# Altium PCB TuringSMD - Copy.PcbDoc (part 2 of 2)
Units mm, origin at the board's own origin, x right, y up, seen from the top; angles counter-clockwise.
Board outline 28 x 100 mm, 2 copper layers (Top Layer, Bottom Layer); 77 components, 85 nets, 274 pads, 71 vias.
Unrouted connection lines stored in the file: 107.
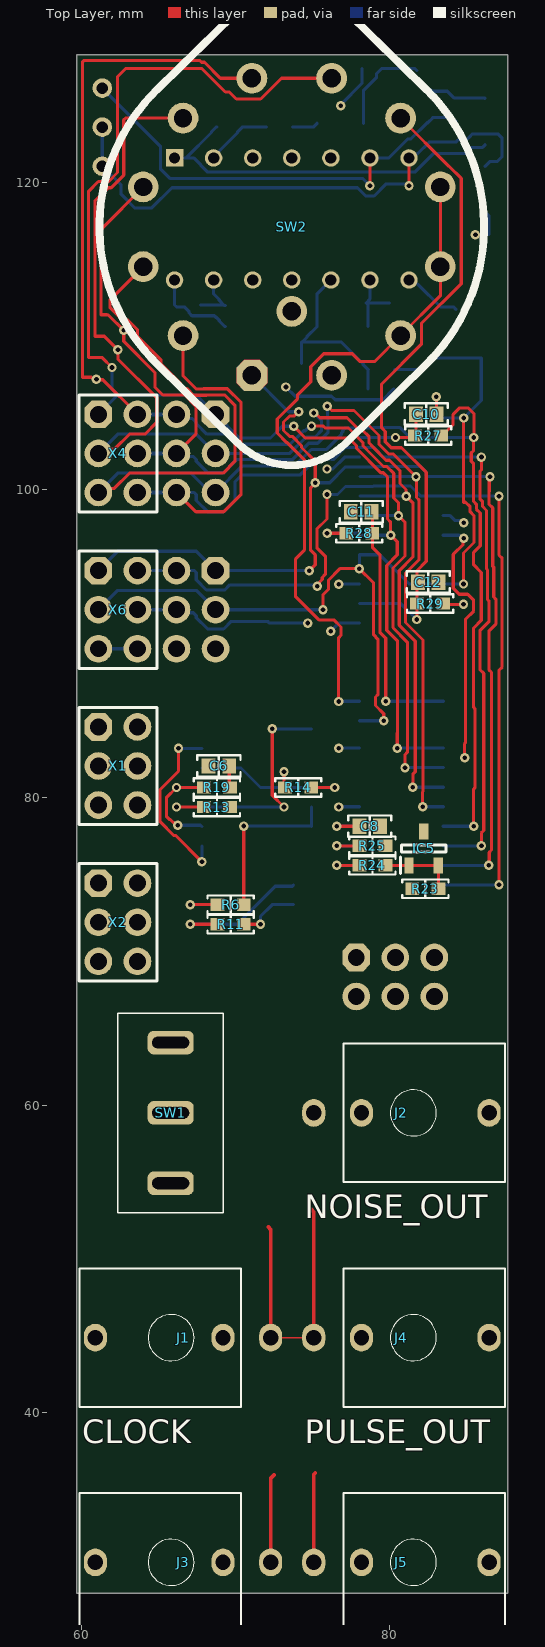
[diagram p0: Top Layer view]

## Via types
v1: diameter 0.61, hole 0.305, Top Layer to Bottom Layer, 71 vias

## Nets (pads, with @x,y where several pads share a name; then routed paths per layer and width w, separated by ;. In a path a pad name is that pad's centre, name@x,y a point inside that pad or via, vN(x,y) a via of type N, cw(c..) or ccw(c..) an arc to the next point about the centre after c; other vN are vias at no path point) (continued)
SCALE_W: J5.3 X1.3 X1.4
STEP12: C12.2 IC7.7 R29.1 SW2.8 | length 42.4
  Top Layer w0.203: SW2.8 83.858,121.038 83.881,121.038 84.675,120.244 84.675,113.392 82.087,110.804 82.087,109.461 79.502,106.877 79.502,104.026 79.74,103.788 79.74,103.121 80.127,102.734 80.794,102.734 82.4,101.128 82.4,95.347 81.806,94.754 R29.1 81.806,91.585 v1(81.788,91.567)
  Bottom Layer w0.203: IC7.7 80.756,92.599 v1(81.788,91.567)
STEP16: IC7.2 SW2.9 SW2.10 SW2.11 | length 44.7
  Top Layer w0.203: v1(76.708,86.233) 76.708,90.379 76.86,90.531 76.86,91.079 76.397,91.542 75.418,91.542 73.914,93.046 73.914,95.504 74.482,96.072 74.482,101.951 73.373,103.06 73.341,103.06 72.716,103.685 72.716,104.6 74.041,105.925 74.041,106.172 74.893,107.024 74.893,107.996 75.735,108.839 77.597,108.839 78.105,108.331 79.039,108.331 SW2.11 83.319,112.611 SW2.10 SW2.9
  Bottom Layer w0.203: v1(76.708,86.233) 76.724,86.249 IC7.2
WRITE_SW: C6.2 IC6.15 R3.1 R19.1 | length 18.5
  Top Layer w0.203: C6.2 69.596,80.694 R19.1 ; v1(84.845,96.844) 84.797,96.796 84.797,96.437 84.159,95.799 84.159,93.596 84.546,93.209 85.093,93.209 85.48,92.822 85.48,92.11 84.963,91.592 84.963,83.566 84.878,83.481 84.878,82.597 v1(84.903,82.572)
  Bottom Layer w0.203: IC6.15 84.538,97.044 84.739,96.844 v1(84.845,96.844)
pads on no net: IC7.3 IC7.4 IC7.5 IC7.11 IC7.12 IC7.13 J1.2 J2.2 J3.2 J4.2 J5.2 Q1.3 SW2.12 X7.5 X7.6
copper on no net: | length 30.1
  Top Layer w0.1: 72.29,44.879 75.09,44.879
  Top Layer w0.254: 72.136,52.07 72.29,51.916 72.29,44.879 ; 72.29,30.27 72.29,35.714 72.517,35.941 ; 74.93,53.213 75.09,53.053 75.09,44.879 ; 75.09,30.27 75.09,35.974 75.184,36.068

## Silkscreen, mask and mechanical layers (free items; w line width, h text height)
Board Shape:
  the board outline again, w0.025